# Altium PCB ARU8113 Testboard_V0.1.PcbDoc (part 2 of 3)
Units mil, origin at the board's own origin, x right, y up, seen from the top; angles counter-clockwise.
Board outline 6377.95 x 5157.48 mil, 4 copper layers (Top, PWR, GND, Bottom), stack 62.992 mil thick; 518 components, 350 nets, 1764 pads, 749 vias.
Unrouted connection lines stored in the file: 230.
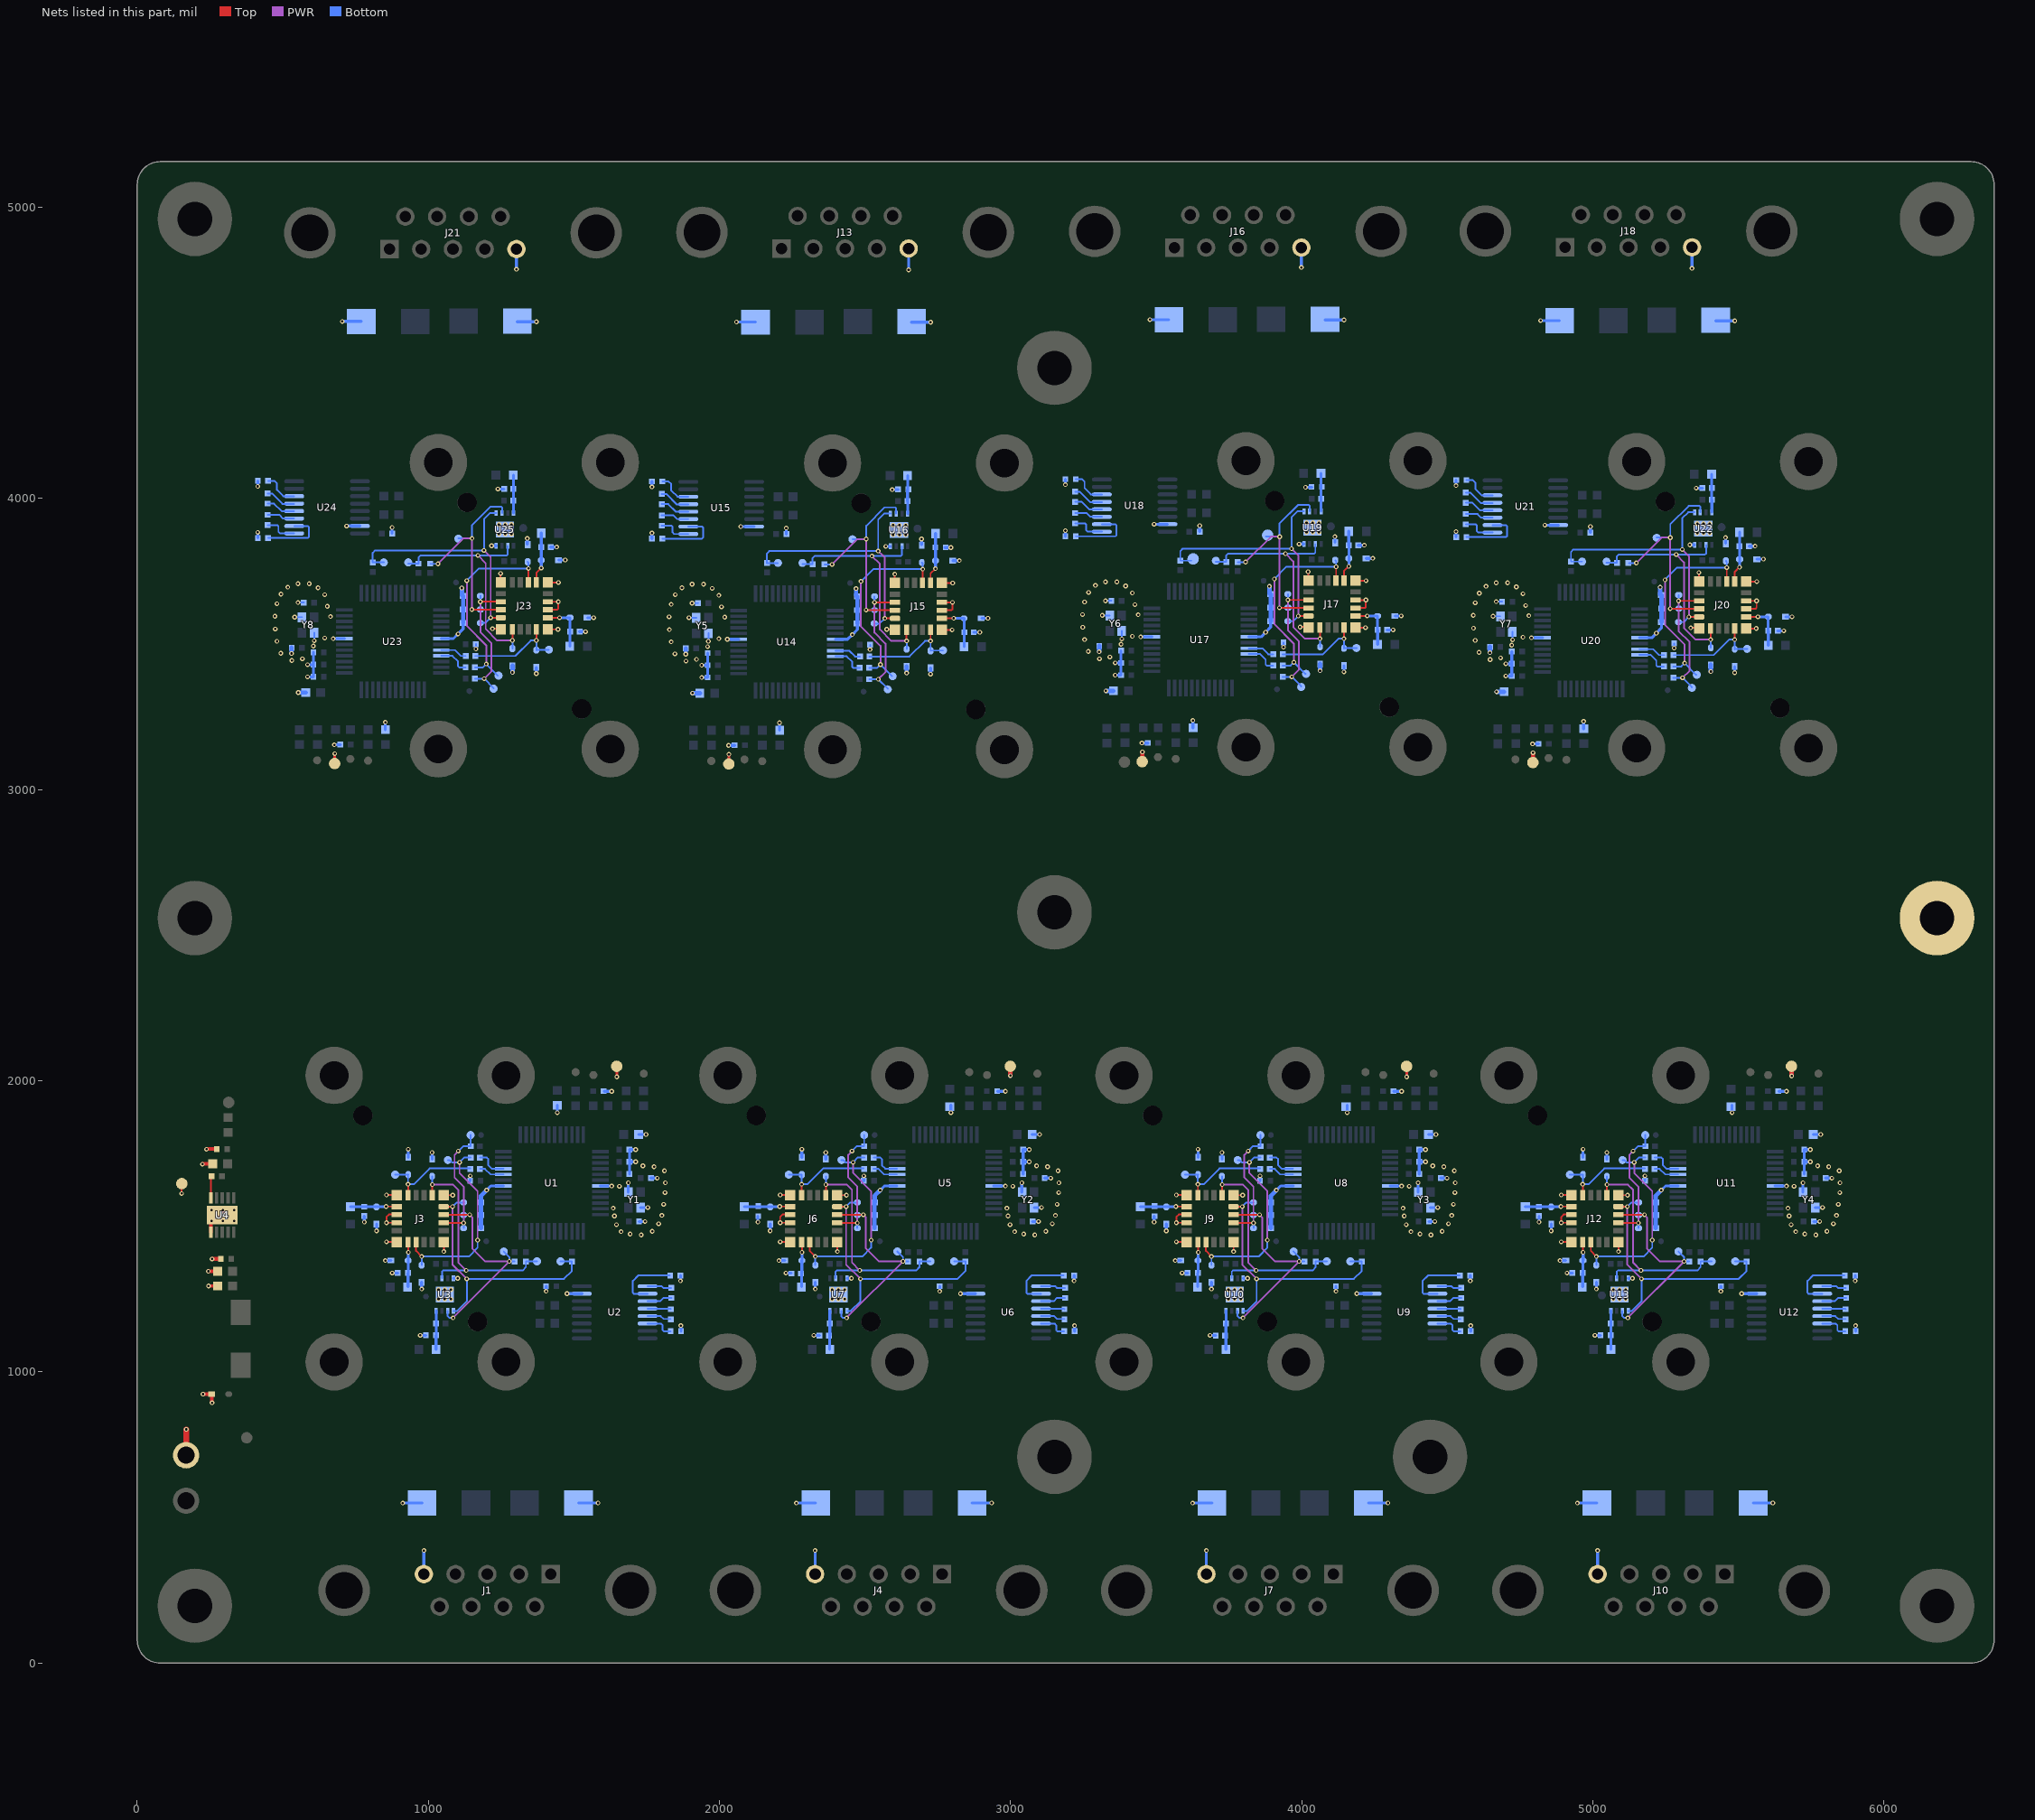
[diagram p4: the nets of this part, all layers, seen from the top]

## Via types
v1: diameter 16, hole 8, Top to Bottom, tented both sides, 749 vias

## Nets (pads, with @x,y where several pads share a name; then routed paths per layer and width w, separated by ;. In a path a pad name is that pad's centre, name@x,y a point inside that pad or via, vN(x,y) a via of type N, cw(c..) or ccw(c..) an arc to the next point about the centre after c; other vN are vias at no path point) (continued)
GND: C1.2 C2.1 C3.2 C4.2 C5.2 C6.2 C7.1 C8.1 C11.2 C12.2 C13.2 C14.1 C15.2 C16.2 C17.2 C18.2 C19.2 C20.2 C21.2 C23.2 C24.1 C25.2 C26.2 C27.2 C28.2 C29.1 C30.1 C33.2 C34.2 C35.2 C36.1 C37.2 C38.2 C39.2 C40.1 C41.2 C42.2 C43.2 C44.2 C45.1 C46.1 C49.2 C50.2 C51.2 C52.1 C53.2 C54.2 C55.2 C56.1 C57.2 C58.2 C59.2 C60.2 C61.1 C62.1 C65.2 C66.2 C67.2 C68.1 C69.2 C70.2 C71.2 C72.1 C73.2 C74.2 C75.2 C76.2 C77.1 C78.1 C81.2 C82.2 C83.2 C84.1 C85.2 C86.2 C87.2 C88.1 C89.2 C90.2 C91.2 C92.2 C93.1 C94.1 C97.2 C98.2 C99.2 C100.1 C101.2 C102.2 C103.2 C104.1 C105.2 C106.2 C107.2 C108.2 C109.1 C110.1 C113.2 C114.2 C115.2 C116.1 C117.2 C118.2 C119.2 C120.1 C121.2 C122.2 C123.2 C124.2 C125.1 C126.1 C129.2 C130.2 C131.2 C132.1 C133.2 C134.2 D1.1 D2.1 D3.1 D4.1 D5.1 D6.1 D8.1 D9.1 D11.1 D12.1 D14.1 D15.1 D16.1 D17.1 D18.1 D19.1 D20.1 D22.1 D23.1 D25.1 D26.1 D27.1 D28.1 D29.1 D30.1 D31.1 D32.1 D34.1 D35.1 D37.1 D38.1 D39.1 D40.1 D41.1 D42.1 D43.1 D45.1 D46.1 D48.1 D49.1 D50.1 D51.1 D52.1 D53.1 D54.1 D55.1 D57.1 D58.1 D60.1 D61.1 D62.1 D63.1 D64.1 D65.1 D66.1 D67.1 D69.1 D70.1 D72.1 D73.1 D74.1 D75.1 D76.1 D77.1 D78.1 D79.1 D81.1 D82.1 D84.1 D85.1 D86.1 D87.1 D88.1 D89.1 D90.1 D91.1 D93.1 D94.1 D96.1 D97.1 D98.1 DC1.2 J1.5 J3.10 J3.11 J3.17 J3.18 J3.19 J3.20 J4.5 J6.10 J6.11 J6.17 J6.18 J6.19 J6.20 J7.5 J9.10 J9.11 J9.17 J9.18 J9.19 J9.20 J10.5 J12.10 J12.11 J12.17 J12.18 J12.19 J12.20 J13.5 J15.10 J15.11 J15.17 J15.18 J15.19 J15.20 J16.5 J17.10 J17.11 J17.17 J17.18 J17.19 J17.20 J18.5 J20.10 J20.11 J20.17 J20.18 J20.19 J20.20 J21.5 J23.10 J23.11 J23.17 J23.18 J23.19 J23.20 pad.2@6182.25,2558.2 R7.1 R26.1 R43.1 R60.1 R77.1 R94.1 R111.1 R128.1 T15.1 T16.1 T17.1 T28.1 T40.1 T52.1 T64.1 T76.1 T88.1 U1.7 U1.30 U2.15 U3.4 U3.9 U4.6 U4.11 U5.7 U5.30 U6.15 U7.4 U7.9 U8.7 U8.30 U9.15 U10.4 U10.9 U11.7 U11.30 U12.15 U13.4 U13.9 U14.7 U14.30 U15.15 U16.4 U16.9 U17.7 U17.30 U18.15 U19.4 U19.9 U20.7 U20.30 U21.15 U22.4 U22.9 U23.7 U23.30 U24.15 U25.4 U25.9 Y1.2 Y1.4 Y2.2 Y2.4 Y3.2 Y3.4 Y4.2 Y4.4 Y5.2 Y5.4 Y6.2 Y6.4 Y7.2 Y7.4 Y8.2 Y8.4 | length 10981
  Top w6: v1(152.56,1612) 152.56,1645.54 T16.1@153.13,1646.1 ; v1(856.32,1446) J3.19@890,1446 ; v1(856.32,1607) J3.20@891,1607 ; J3.10@890.89,1511.82 856.43,1511.82 856.43,1531.43 864.74,1539.74 J3.11@891,1539.74 ; J3.17@1052.42,1606.42 v1(1084,1606.42) ; v1(1053,1413) J3.18@1053,1445 ; v1(1220.37,3552.01) J23.17@1247.41,3552.01 ; J23.18@1248,3713 1248.04,3713.04 v1(1248.04,3741.96) ; J23.20@1410.42,3550 v1(1445,3550) ; J23.11@1410.42,3617.34 1442.81,3617.34 1446.32,3620.86 v1(1446.32,3644.71) ; J23.10@1410.42,3644.8 v1@1446.22,3644.8 ; J23.19@1410.42,3711 v1(1447,3711) ; v1(2208.32,1446) J6.19@2242,1446 ; v1(2208.32,1607) J6.20@2243,1607 ; J6.10@2242.89,1511.82 2208.43,1511.82 2208.43,1531.43 2216.74,1539.74 J6.11@2243,1539.74 ; J6.17@2404.42,1606.42 v1(2436,1606.42) ; v1(2405,1413) J6.18@2405,1445 ; v1(2574.37,3550.01) J15.17@2601.41,3550.01 ; J15.18@2602,3711 2602.04,3711.04 v1(2602.04,3739.96) ; J15.20@2764.42,3548 v1(2799,3548) ; J15.11@2764.42,3615.34 2796.81,3615.34 2800.32,3618.86 v1(2800.32,3642.71) ; J15.10@2764.42,3642.8 v1@2800.22,3642.8 ; J15.19@2764.42,3709 v1(2801,3709) ; v1(3569.32,1446) J9.19@3603,1446 ; v1(3569.32,1607) J9.20@3604,1607 ; J9.10@3603.89,1511.82 3569.43,1511.82 3569.43,1531.43 3577.74,1539.74 J9.11@3604,1539.74 ; J9.17@3765.42,1606.42 v1(3797,1606.42) ; v1(3766,1413) J9.18@3766,1445 ; v1(3994.37,3558.01) J17.17@4021.41,3558.01 ; J17.18@4022,3719 4022.04,3719.04 v1(4022.04,3747.96) ; J17.20@4184.42,3556 v1(4219,3556) ; J17.11@4184.42,3623.34 4216.81,3623.34 4220.32,3626.86 v1(4220.32,3650.71) ; J17.10@4184.42,3650.8 v1@4220.22,3650.8 ; J17.19@4184.42,3717 v1(4221,3717) ; v1(4891.32,1446) J12.19@4925,1446 ; v1(4891.32,1607) J12.20@4926,1607 ; J12.10@4925.89,1511.82 4891.43,1511.82 4891.43,1531.43 4899.74,1539.74 J12.11@4926,1539.74 ; J12.17@5087.42,1606.42 v1(5119,1606.42) ; v1(5088,1413) J12.18@5088,1445 ; v1(5336.37,3555.01) J20.17@5363.41,3555.01 ; J20.18@5364,3716 5364.04,3716.04 v1(5364.04,3744.96) ; J20.20@5526.42,3553 v1(5561,3553) ; J20.11@5526.42,3620.34 5558.81,3620.34 5562.32,3623.86 v1(5562.32,3647.71) ; J20.10@5526.42,3647.8 v1@5562.22,3647.8 ; J20.19@5526.42,3714 v1(5563,3714)
  Top w10: v1(257.13,1387.1) v1@257.63,1387.6 ; C17.2@286.91,1387.6 C17.2@287.41,1388.11 ; T17.1@678.5,3089 v1(678.5,3123) ; v1@1647.5,2013.5 T15.1@1647.5,2048.5 ; T64.1@2032.5,3087 v1(2032.5,3121) ; v1@4360.5,2013.5 T40.1@4360.5,2048.5
  Top w11.81: v1@224.13,1714.11 C20.2@259.54,1714.11 ; v1(226.13,923.1) D14.1@255.6,923.1 256.36,922.34 256.36,893.87 v1(257.13,893.1) ; v1(238,1764.1) 239,1765.11 C21.2@273.41,1765.11 C21.2@274.41,1766.11 ; v1(244,1345) 244.05,1345.05 C18.2@276.54,1345.11 ; v1(245,1294.55) C19.2@276.54,1294.55 ; U4.6@252.76,1479.05 252.76,1515.73 v1(255.13,1518.1)
  Top w15: v1@257.63,1387.6 C17.2@286.91,1387.6 ; v1(2999,2017) T28.1@2999,2049 ; T76.1@3452,3095.5 3452.31,3095.81 3452.31,3128.81 v1(3452.5,3129) ; T88.1@4794,3092.5 4794.31,3092.81 4794.31,3125.81 v1(4794.5,3126) ; v1(5683,2016) T52.1@5683,2048
  Top w20: DC1.2@168.56,713.49 v1(168.56,802)
  Bottom w6: v1(541,3592) Y8.4@566.33,3592 ; v1(552,3642) C126.1@572.28,3642 ; v1(608,3511) Y8.2@608,3538.43 ; v1(1163.3,3482.69) C123.2@1163.3,3499 ; v1(1895,3590) Y5.4@1920.33,3590 ; v1(1906,3640) C78.1@1926.28,3640 ; v1(1962,3509) Y5.2@1962,3536.43 ; v1(2517.3,3480.69) C75.2@2517.3,3497 ; v1(3315,3598) Y6.4@3340.33,3598 ; v1(3326,3648) C94.1@3346.28,3648 ; v1(3382,3517) Y6.2@3382,3544.43 ; v1(3937.3,3488.69) C91.2@3937.3,3505 ; v1(4657,3595) Y7.4@4682.33,3595 ; v1(4668,3645) C110.1@4688.28,3645 ; v1(4724,3514) Y7.2@4724,3541.43 ; v1(5279.3,3485.69) C107.2@5279.3,3502
  Bottom w10: C131.2@414,3863.95 v1(414,3883) ; v1@414.14,4041.14 C130.2@414.14,4060 ; v1(585,3386.71) C120.1@603.28,3386.71 ; v1(585,3428.71) C121.2@605.29,3428.71 ; C120.1@605.28,3386.71 C121.2@605.29,3428.71 ; C122.2@605.29,3470.71 C121.2@605.29,3428.71 ; v1@673.09,3518.09 U23.7@711.54,3518.09 ; v1@677.5,3153.5 C124.2@697.48,3153.5 ; v1(704.32,4607.71) D93.1@769.18,4607.71 ; v1(719,3905) U24.15@764.95,3905 ; v1(780,1514) C16.2@779.98,1534.49 ; v1(822,1484) D12.1@822,1507.47 ; R128.1@852,3205.59 v1(852,3231) ; v1(852.23,1381.98) D11.1@871.7,1381.96 ; C129.2@875.54,3879.54 v1@875.54,3900 ; v1(876,1339) C15.2@894.57,1339 ; v1(912,549) D9.1@978.5,549 ; D1.1@931,1736.06 v1(931,1764) ; v1(972,1125) C14.1@991.28,1125 ; v1(977,1284) D2.1@977,1307 ; J1.5@984.72,305.2 v1@984.72,386 ; D5.1@1013,1730.53 v1(1013,1753) ; U23.30@1044.21,3518.17 1086.17,3518.17 v1(1102,3534) 1119.39,3551.39 D89.1@1119.39,3571.61 ; U3.4@1086.5,1321 v1(1101,1321) ; C5.2@1143.72,1655.65 v1(1143.72,1672.61) ; v1@1200.38,1624 1214.64,1638.26 U1.30@1257.79,1638.26 ; v1(1217,3837) U25.4@1233.3,3837 ; v1(1239,4032) C132.1@1260,4032 ; v1(1302.69,4787) J21.5@1302.69,4856.19 ; D94.1@1305.93,4606.71 v1(1371.32,4606.71) ; D87.1@1339.81,3843.19 v1(1339.81,3862.47) ; v1(1371,3398) D86.1@1371,3418.7 ; v1(1404.64,1276.29) C11.2@1404.64,1294 ; C133.2@1420.28,3832.75 v1@1440.75,3832.75 ; v1(1443,1889.82) R7.1@1443,1915.41 ; D96.1@1447.41,3787.91 v1@1469.64,3787.91 ; v1(1476.02,1268) U2.15@1527.2,1268 ; D8.1@1515.65,549.1 v1(1583,549.1) ; C134.2@1519.14,3542 v1(1540,3542) ; D97.1@1547.36,3590.02 v1(1568,3590) ; U1.7@1590.46,1638.13 v1@1629.61,1638.13 ; C6.2@1603.86,1963.08 v1(1630,1963.08) ; Y1.2@1686.67,1617.07 v1@1686.67,1648.33 ; C4.2@1690.71,1679 C3.2@1690.71,1721 ; v1(1712,1721) C3.2@1690.71,1721 ; v1(1712,1763) C2.1@1690.72,1763 C3.2@1690.71,1721 ; C1.2@1722.18,1815 v1(1747.77,1815) ; C8.1@1723.72,1516 v1(1744,1516) ; Y1.4@1728.75,1564 v1(1754,1564) ; C7.1@1764.72,1665 v1(1786,1665) ; C83.2@1768,3861.95 v1(1768,3881) ; v1@1768.14,4039.14 C82.2@1768.14,4058 ; v1(1866,1312) C13.2@1866,1330 ; C12.2@1867.54,1139.47 v1@1867.54,1158.39 ; v1(1939,3384.71) C72.1@1957.28,3384.71 ; v1(1939,3426.71) C73.2@1959.29,3426.71 ; C72.1@1959.28,3384.71 C73.2@1959.29,3426.71 ; C74.2@1959.29,3468.71 C73.2@1959.29,3426.71 ; v1@2027.09,3516.09 U14.7@2065.54,3516.09 ; v1@2031.5,3151.5 C76.2@2051.48,3151.5 ; v1(2058.32,4605.71) D57.1@2123.18,4605.71 ; v1(2073,3903) U15.15@2118.95,3903 ; v1(2132,1514) C38.2@2131.98,1534.49 ; v1(2174,1484) D26.1@2174,1507.47 ; v1(2204.23,1381.98) D25.1@2223.7,1381.96 ; R77.1@2206,3203.59 v1(2206,3229) ; v1(2228,1339) C37.2@2246.57,1339 ; C81.2@2229.54,3877.54 v1@2229.54,3898 ; v1(2264,549) D23.1@2330.5,549 ; D15.1@2283,1736.06 v1(2283,1764) ; v1(2324,1125) C36.1@2343.28,1125 ; J4.5@2328.43,304.91 v1(2328.43,386) ; v1(2329,1284) D16.1@2329,1307 ; D19.1@2365,1730.53 v1(2365,1753) ; U14.30@2398.21,3516.17 2440.17,3516.17 v1(2456,3532) 2473.39,3549.39 D53.1@2473.39,3569.61 ; U7.4@2438.5,1321 v1(2453,1321) ; C27.2@2495.72,1655.65 v1(2495.72,1672.61) ; v1@2552.38,1624 2566.64,1638.26 U5.30@2609.79,1638.26 ; v1(2571,3835) U16.4@2587.3,3835 ; v1(2593,4030) C84.1@2614,4030 ; v1(2649.69,4785) J13.5@2649.69,4858.19 ; D58.1@2659.93,4604.71 v1(2725.32,4604.71) ; D51.1@2693.81,3841.19 v1(2693.81,3860.47) ; v1(2725,3396) D50.1@2725,3416.7 ; v1(2756.64,1276.29) C33.2@2756.64,1294 ; C85.2@2774.28,3830.75 v1@2794.75,3830.75 ; v1(2795,1889.82) R26.1@2795,1915.4 ; D60.1@2801.41,3785.91 v1@2823.64,3785.91 ; v1(2828.02,1268) U6.15@2879.2,1268 ; D22.1@2867.65,549.1 v1(2935,549.1) ; C86.2@2873.14,3540 v1(2894,3540) ; D61.1@2901.36,3588.02 v1(2922,3588) ; U5.7@2942.46,1638.13 v1@2981.61,1638.13 ; C28.2@2955.86,1963.08 v1(2982,1963.08) ; Y2.2@3038.67,1617.07 v1@3038.67,1648.33 ; C26.2@3042.71,1679 C25.2@3042.71,1721 ; v1(3064,1721) C25.2@3042.71,1721 ; v1(3064,1763) C24.1@3042.72,1763 C25.2@3042.71,1721 ; C23.2@3074.18,1815 v1(3099.77,1815) ; C30.1@3075.72,1516 v1(3096,1516) ; Y2.4@3080.75,1564 v1(3106,1564) ; C29.1@3116.72,1665 v1(3138,1665) ; C99.2@3188,3869.95 v1(3188,3889) ; v1@3188.14,4047.14 C98.2@3188.14,4066 ; v1(3218,1312) C35.2@3218,1330 ; C34.2@3219.54,1139.47 v1@3219.54,1158.39 ; v1(3359,3392.71) C88.1@3377.28,3392.71 ; v1(3359,3434.71) C89.2@3379.29,3434.71 ; C88.1@3379.28,3392.71 C89.2@3379.29,3434.71 ; C90.2@3379.29,3476.71 C89.2@3379.29,3434.71 ; v1@3447.09,3524.09 U17.7@3485.54,3524.09 ; v1@3451.5,3159.5 C92.2@3471.48,3159.5 ; v1(3478.32,4613.71) D69.1@3543.18,4613.71 ; v1(3493,1514) C54.2@3492.98,1534.49 ; v1(3493,3911) U18.15@3538.95,3911 ; v1(3535,1484) D98.1@3535,1507.47 ; v1(3565.23,1381.98) D37.1@3584.7,1381.96 ; v1(3589,1339) C53.2@3607.57,1339 ; v1(3625,549) D35.1@3691.5,549 ; R94.1@3626,3211.59 v1(3626,3237) ; D27.1@3644,1736.06 v1(3644,1764) ; C97.2@3649.54,3885.54 v1@3649.54,3906 ; J7.5@3672.43,304.91 v1(3672.43,386) ; v1(3685,1125) C52.1@3704.28,1125 ; v1(3690,1284) D28.1@3690,1307 ; D31.1@3726,1730.53 v1(3726,1753) ; U10.4@3799.5,1321 v1(3814,1321) ; U17.30@3818.21,3524.17 3860.17,3524.17 v1(3876,3540) 3893.39,3557.39 D65.1@3893.39,3577.61 ; C43.2@3856.72,1655.65 v1(3856.72,1672.61) ; v1@3913.38,1624 3927.64,1638.26 U8.30@3970.79,1638.26 ; v1(3991,3843) U19.4@4007.3,3843 ; v1(3998.82,4793) J16.5@3998.82,4861.29 ; v1(4013,4038) C100.1@4034,4038 ; D70.1@4079.93,4612.71 v1(4145.32,4612.71) ; D63.1@4113.81,3849.19 v1(4113.81,3868.47) ; v1(4117.64,1276.29) C49.2@4117.64,1294 ; v1(4145,3404) D62.1@4145,3424.7 ; v1(4156,1889.82) R43.1@4156,1915.4 ; v1(4189.02,1268) U9.15@4240.2,1268 ; C101.2@4194.28,3838.75 v1@4214.75,3838.75 ; D72.1@4221.41,3793.91 v1@4243.64,3793.91 ; D34.1@4228.65,549.1 v1(4296,549.1) ; C102.2@4293.14,3548 v1(4314,3548) ; U8.7@4303.46,1638.13 v1@4342.61,1638.13 ; C44.2@4316.86,1963.08 v1(4343,1963.08) ; D73.1@4321.36,3596.02 v1(4342,3596) ; Y3.2@4399.67,1617.07 v1@4399.67,1648.33 ; C42.2@4403.71,1679 C41.2@4403.71,1721 ; v1(4425,1721) C41.2@4403.71,1721 ; v1(4425,1763) C40.1@4403.72,1763 C41.2@4403.71,1721 ; C39.2@4435.18,1815 v1(4460.77,1815) ; C46.1@4436.72,1516 v1(4457,1516) ; Y3.4@4441.75,1564 v1(4467,1564) ; C45.1@4477.72,1665 v1(4499,1665) ; C115.2@4530,3866.95 v1(4530,3886) ; v1@4530.14,4044.14 C114.2@4530.14,4063 ; v1(4579,1312) C51.2@4579,1330 ; C50.2@4580.54,1139.47 v1@4580.54,1158.39 ; v1(4701,3389.71) C104.1@4719.28,3389.71 ; v1(4701,3431.71) C105.2@4721.29,3431.71 ; C104.1@4721.28,3389.71 C105.2@4721.29,3431.71 ; C106.2@4721.29,3473.71 C105.2@4721.29,3431.71 ; v1@4789.09,3521.09 U20.7@4827.54,3521.09 ; v1@4793.5,3156.5 C108.2@4813.48,3156.5 ; v1(4815,1514) C70.2@4814.98,1534.49 ; v1(4820.32,4610.71) D81.1@4885.18,4610.71 ; v1(4835,3908) U21.15@4880.95,3908 ; v1(4857,1484) D49.1@4857,1507.47 ; v1(4887.23,1381.98) D48.1@4906.7,1381.96 ; v1(4911,1339) C69.2@4929.57,1339 ; v1(4947,549) D46.1@5013.5,549 ; D38.1@4966,1736.06 v1(4966,1764) ; R111.1@4968,3208.59 v1(4968,3234) ; C113.2@4991.54,3882.54 v1@4991.54,3903 ; v1(5007,1125) C68.1@5026.28,1125 ; v1(5012,1284) D39.1@5012,1307 ; J10.5@5016.43,304.91 v1(5016.43,386) ; D42.1@5048,1730.53 v1(5048,1753) ; U13.4@5121.5,1321 v1(5136,1321) ; U20.30@5160.21,3521.17 5202.17,3521.17 v1(5218,3537) 5235.39,3554.39 D77.1@5235.39,3574.61 ; C59.2@5178.72,1655.65 v1(5178.72,1672.61) ; v1@5235.38,1624 5249.64,1638.26 U11.30@5292.79,1638.26 ; v1(5333,3840) U22.4@5349.3,3840 ; v1(5340.69,4790) J18.5@5340.69,4862.19 ; v1(5355,4035) C116.1@5376,4035 ; D82.1@5421.93,4609.71 v1(5487.32,4609.71) ; v1(5439.64,1276.29) C65.2@5439.64,1294 ; D75.1@5455.81,3846.19 v1(5455.81,3865.47) ; v1(5478,1889.82) R60.1@5478,1915.4 ; v1(5487,3401) D74.1@5487,3421.7 ; v1(5511.02,1268) U12.15@5562.2,1268 ; C117.2@5536.28,3835.75 v1@5556.75,3835.75 ; D45.1@5550.65,549.1 v1(5618,549.1) ; D84.1@5563.41,3790.91 v1@5585.64,3790.91 ; U11.7@5625.46,1638.13 v1@5664.61,1638.13 ; C118.2@5635.14,3545 v1(5656,3545) ; C60.2@5638.86,1963.08 v1(5665,1963.08) ; D85.1@5663.36,3593.02 v1(5684,3593) ; Y4.2@5721.67,1617.07 v1@5721.67,1648.33 ; C58.2@5725.71,1679 C57.2@5725.71,1721 ; v1(5747,1721) C57.2@5725.71,1721 ; v1(5747,1763) C56.1@5725.72,1763 C57.2@5725.71,1721 ; C55.2@5757.18,1815 v1(5782.77,1815) ; C62.1@5758.72,1516 v1(5779,1516) ; Y4.4@5763.75,1564 v1(5789,1564) ; C61.1@5799.72,1665 v1(5821,1665) ; v1(5901,1312) C67.2@5901,1330 ; C66.2@5902.54,1139.47 v1@5902.54,1158.39
  Bottom w15: v1(530.19,3467) C125.1@530.19,3487 ; v1(553.23,3332.71) C119.2@578.82,3332.71 ; v1(1115,3692) 1115.19,3691.81 1115.19,3667.34 1117.53,3665 D91.1@1119.47,3665 D89.1@1119.47,3572.47 ; D6.1@1180.53,1493 D3.1@1180.53,1538 D4.1@1180.53,1581 ; D4.1@1181,1581.47 1181,1604.73 v1@1200,1623.73 ; v1(1289,3402) D90.1@1289,3424.94 ; v1(1884.19,3465) C77.1@1884.19,3485 ; v1(1907.23,3330.71) C71.2@1932.82,3330.71 ; v1(2469,3690) 2469.19,3689.81 2469.19,3665.34 2471.53,3663 D55.1@2473.47,3663 D53.1@2473.47,3570.47 ; D20.1@2532.53,1493 D17.1@2532.53,1538 D18.1@2532.53,1581 ; D18.1@2533,1581.47 2533,1604.73 v1@2552,1623.73 ; v1(2643,3400) D54.1@2643,3422.94 ; v1(3304.19,3473) C93.1@3304.19,3493 ; v1(3327.23,3338.71) C87.2@3352.82,3338.71 ; v1(3889,3698) 3889.19,3697.81 3889.19,3673.34 3891.53,3671 D67.1@3893.47,3671 D65.1@3893.47,3578.47 ; D32.1@3893.53,1493 D29.1@3893.53,1538 D30.1@3893.53,1581 ; D30.1@3894,1581.47 3894,1604.73 v1@3913,1623.73 ; v1(4063,3408) D66.1@4063,3430.94 ; v1(4646.19,3470) C109.1@4646.19,3490 ; v1(4669.23,3335.71) C103.2@4694.82,3335.71 ; D43.1@5215.53,1493 D40.1@5215.53,1538 D41.1@5215.53,1581 ; D41.1@5216,1581.47 5216,1604.73 v1@5235,1623.73 ; v1(5231,3695) 5231.19,3694.81 5231.19,3670.34 5233.53,3668 D79.1@5235.47,3668 D77.1@5235.47,3575.47 ; v1(5405,3405) D78.1@5405,3427.94
  other v1: 985,386 1867.36,1158.56 3219.36,1158.56 4580.36,1158.56 5902.36,1158.56 1035,1249 1056.5,1249 1078,1249 2387,1249 2408.5,1249 2430,1249 3748,1249 3769.5,1249 3791,1249 5070,1249 5091.5,1249 5113,1249 1035,1282 1056.5,1282 1078,1282 2387,1282 2408.5,1282 2430,1282 3748,1282 3769.5,1282 3791,1282 5070,1282 5091.5,1282 5113,1282 1731,1470 3083,1470 4444,1470 5766,1470 1693,1473 3045,1473 4406,1473 5728,1473 1662,1481 3014,1481 4375,1481 5697,1481 1769,1482 3121,1482 4482,1482 5804,1482 1646,1505 2998,1505 4359,1505 5681,1505 1791,1508 3143,1508 4504,1508 5826,1508 856.32,1511.71 2208.32,1511.71 3569.32,1511.71 4891.32,1511.71 294.13,1518.1 333.13,1518.1 1639,1535 2991,1535 4352,1535 5674,1535 1802,1537 3154,1537 4515,1537 5837,1537 255.13,1555.1 294.13,1555.1 333.13,1555.1 1635,1562 2987,1562 4348,1562 5670,1562 1808,1575 3160,1575 4521,1575 5843,1575 1813,1615 3165,1615 4526,1615 5848,1615 1200,1624 2552,1624 3913,1624 5235,1624 1656,1637 3008,1637 4369,1637 5691,1637 1630,1638 2982,1638 4343,1638 5665,1638 1686.66,1649 1814,1649 3038.66,1649 3166,1649 4399.66,1649 4527,1649 5721.67,1649 5849,1649 1811,1690 3163,1690 4524,1690 5846,1690 1775,1704 3127,1704 4488,1704 5810,1704 1737,1707 3089,1707 4450,1707 5772,1707 224.13,1713.1 1647.5,2013 4360.5,2013 2031,3151.5 677,3153.5 4793,3156.5 3451,3159.5 1885,3441 531,3443 4647,3446 1921,3447 567,3449 3305,3449 4683,3452 3341,3455 1847,3466 493,3468 4609,3471 3267,3474 1959,3490.71 605,3492.71 4721,3495.71 3379,3498.71 1834,3507 480,3509 4596,3512 3254,3515 2027,3516 673,3518 1998,3518 644,3520 4789,3521 4760,3523 3447,3524 3418,3526 1828,3549 474,3551 4590,3554 3248,3557 2018,3592 1827,3593 664,3594 473,3595 4780,3597 4589,3598 3438,3600 3247,3601 2007,3627 653,3629 4769,3632 3427,3635 1834,3636 480,3638 4596,3641 3254,3644 1998,3667 644,3669 1848,3669 494,3671 4760,3672 4610,3674 3418,3675 3268,3677 1975,3691 621,3693 1871,3693 517,3695 4737,3696 4633,3698 3395,3699 3291,3701 1906,3705 1945,3705 552,3707 591,3707 4668,3710 4707,3710 3326,3713 3365,3713 2824,3786.27 1470,3788.27 5586,3791.27 4244,3794.27 2795,3831 1441,3833 5557,3836 4215,3839 2596.5,3875 2618,3875 2639.5,3875 1242.5,3877 1264,3877 1285.5,3877 5358.5,3880 5380,3880 5401.5,3880 4016.5,3883 4038,3883 4059.5,3883 2229.36,3898 875.36,3900 4991.36,3903 3649.36,3906 2596.5,3908 2618,3908 2639.5,3908 1242.5,3910 1264,3910 1285.5,3910 5358.5,3913 5380,3913 5401.5,3913 4016.5,3916 4038,3916 4059.5,3916 1768,4039 414,4041 4530,4044 3188,4047
IMU_CS_1: D6.2 J3.3 R12.2 T10.1 | length 438.7
  Top w6: J3.3@1052.42,1511.46 v1@1121.11,1511.46
  PWR w6: v1(1103,1758) 1090,1745 1090,1667 1121.11,1635.89 v1(1121.11,1511)
  Bottom w6: v1@1103.33,1758 1120.33,1775 R12.2@1144.95,1775 ; D6.2@1121.29,1493 v1@1121.29,1511 ; R12.2@1145,1774.95 T10.1@1145,1813
IMU_CS_2: D20.2 J6.3 R30.2 T27.1 | length 438.7
  Top w6: J6.3@2404.42,1511.46 v1@2473.11,1511.46
  PWR w6: v1(2455,1758) 2442,1745 2442,1667 2473.11,1635.89 v1(2473.11,1511)
  Bottom w6: v1@2455.33,1758 2472.33,1775 R30.2@2496.95,1775 ; D20.2@2473.29,1493 v1@2473.29,1511 ; R30.2@2497,1774.95 T27.1@2497,1813
IMU_CS_3: D32.2 J9.3 R47.2 T39.1 | length 438.7
  Top w6: J9.3@3765.42,1511.46 v1@3834.11,1511.46
  PWR w6: v1(3816,1758) 3803,1745 3803,1667 3834.11,1635.89 v1(3834.11,1511)
  Bottom w6: v1@3816.33,1758 3833.33,1775 R47.2@3857.95,1775 ; D32.2@3834.29,1493 v1@3834.29,1511 ; R47.2@3858,1774.95 T39.1@3858,1813
IMU_CS_4: D43.2 J12.3 R64.2 T51.1 | length 438.7
  Top w6: J12.3@5087.42,1511.46 v1@5156.11,1511.46
  PWR w6: v1(5138,1758) 5125,1745 5125,1667 5156.11,1635.89 v1(5156.11,1511)
  Bottom w6: v1@5138.33,1758 5155.33,1775 R64.2@5179.95,1775 ; D43.2@5156.29,1493 v1@5156.29,1511 ; R64.2@5180,1774.95 T51.1@5180,1813
IMU_CS_5: D55.2 J15.3 R81.2 T63.1 | length 457.1
  Top w6: v1@2533,3642.9 J15.3@2603,3642.9
  PWR w6: v1(2532.53,3642.9) 2532.53,3538.47 2570,3501 2570,3403 v1(2545.65,3378.65)
  Bottom w6: R81.2@2514.28,3378.65 v1(2545.65,3378.65) T63.1@2578,3346.31 ; v1(2532.53,3642.9) D55.2@2532.53,3663
IMU_CS_6: D67.2 J17.3 R98.2 T75.1 | length 457.1
  Top w6: v1@3953,3650.9 J17.3@4023,3650.9
  PWR w6: v1(3952.53,3650.9) 3952.53,3546.47 3990,3509 3990,3411 v1(3965.65,3386.65)
  Bottom w6: R98.2@3934.28,3386.65 v1(3965.65,3386.65) T75.1@3998,3354.31 ; v1(3952.53,3650.9) D67.2@3952.53,3671
IMU_CS_7: D79.2 J20.3 R115.2 T87.1 | length 457.1
  Top w6: v1@5295,3647.9 J20.3@5365,3647.9
  PWR w6: v1(5294.53,3647.9) 5294.53,3543.47 5332,3506 5332,3408 v1(5307.65,3383.65)
  Bottom w6: R115.2@5276.28,3383.65 v1(5307.65,3383.65) T87.1@5340,3351.31 ; v1(5294.53,3647.9) D79.2@5294.53,3668
IMU_CS_8: D91.2 J23.3 R132.2 T99.1 | length 457.1
  Top w6: v1@1179,3644.9 J23.3@1249,3644.9
  PWR w6: v1(1178.53,3644.9) 1178.53,3540.47 1216,3503 1216,3405 v1(1191.65,3380.65)
  Bottom w6: R132.2@1160.28,3380.65 v1(1191.65,3380.65) T99.1@1224,3348.31 ; v1(1178.53,3644.9) D91.2@1178.53,3665
IMU_INT1_1: D1.2 J3.13 R3.2 T2.1 | length 350
  Top w6: J3.13@930.37,1606.42 v1@930.37,1643.81
  Bottom w6: T2.1@886,1677 D1.2@931,1677 ; D1.2@930.18,1676.18 v1(930.18,1644) 950,1644 1004.28,1698.28 R3.2@1143.13,1698.28
IMU_INT1_2: D15.2 J6.13 R21.2 T19.1 | length 350
  Top w6: J6.13@2282.37,1606.42 v1@2282.37,1643.81
  Bottom w6: T19.1@2238,1677 D15.2@2283,1677 ; D15.2@2282.18,1676.18 v1(2282.18,1644) 2302,1644 2356.28,1698.28 R21.2@2495.13,1698.28
IMU_INT1_3: D27.2 J9.13 R38.2 T31.1 | length 350
  Top w6: J9.13@3643.37,1606.42 v1@3643.37,1643.81
  Bottom w6: T31.1@3599,1677 D27.2@3644,1677 ; D27.2@3643.18,1676.18 v1(3643.18,1644) 3663,1644 3717.28,1698.28 R38.2@3856.13,1698.28
IMU_INT1_4: D38.2 J12.13 R55.2 T43.1 | length 350
  Top w6: J12.13@4965.37,1606.42 v1@4965.37,1643.81
  Bottom w6: T43.1@4921,1677 D38.2@4966,1677 ; D38.2@4965.18,1676.18 v1(4965.18,1644) 4985,1644 5039.28,1698.28 R55.2@5178.13,1698.28
IMU_INT1_5: D50.2 J15.13 R72.2 T55.1 | length 346.5
  Top w6: v1(2725,3510) J15.13@2725.05,3548.41
  Bottom w6: R72.2@2514.81,3456.65 2652.65,3456.65 2706,3510 v1(2725,3510) D50.2@2725,3476.4 ; D50.2@2725.8,3477.2 T55.1@2768,3477.2
IMU_INT1_6: D62.2 J17.13 R89.2 T67.1 | length 346.5
  Top w6: v1(4145,3518) J17.13@4145.05,3556.41
  Bottom w6: R89.2@3934.81,3464.65 4072.65,3464.65 4126,3518 v1(4145,3518) D62.2@4145,3484.4 ; D62.2@4145.8,3485.2 T67.1@4188,3485.2
IMU_INT1_7: D74.2 J20.13 R106.2 T79.1 | length 346.5
  Top w6: v1(5487,3515) J20.13@5487.05,3553.41
  Bottom w6: R106.2@5276.81,3461.65 5414.65,3461.65 5468,3515 v1(5487,3515) D74.2@5487,3481.4 ; D74.2@5487.8,3482.2 T79.1@5530,3482.2
IMU_INT1_8: D86.2 J23.13 R123.2 T91.1 | length 346.5
  Top w6: v1(1371,3512) J23.13@1371.05,3550.41
  Bottom w6: R123.2@1160.81,3458.65 1298.65,3458.65 1352,3512 v1(1371,3512) D86.2@1371,3478.4 ; D86.2@1371.8,3479.2 T91.1@1414,3479.2
IMU_INT2_1: D2.2 J3.7 R6.2 T5.1 | length 697.5
  Top w6: J3.7@957.93,1445 957.93,1415.07 v1(977,1396)
  PWR w6: v1(1107,1719.09) 1107,1682.37 1169,1620.37 v1(1169,1452)
  Bottom w6: D2.2@977,1367.16 v1(977,1396) 1139,1396 1169,1426 v1(1169,1452) ; T5.1@1067,1727 1072.83,1727 1080.74,1719.09 v1(1107,1719.09) 1107.09,1719.09 1124,1736 R6.2@1145.29,1736
IMU_INT2_2: D16.2 J6.7 R24.2 T22.1 | length 697.5
  Top w6: J6.7@2309.93,1445 2309.93,1415.07 v1(2329,1396)
  PWR w6: v1(2459,1719.09) 2459,1682.37 2521,1620.37 v1(2521,1452)
  Bottom w6: D16.2@2329,1367.16 v1(2329,1396) 2491,1396 2521,1426 v1(2521,1452) ; T22.1@2419,1727 2424.83,1727 2432.74,1719.09 v1(2459,1719.09) 2459.09,1719.09 2476,1736 R24.2@2497.29,1736
IMU_INT2_3: D28.2 J9.7 R41.2 T34.1 | length 697.5
  Top w6: J9.7@3670.93,1445 3670.93,1415.07 v1(3690,1396)
  PWR w6: v1(3820,1719.09) 3820,1682.37 3882,1620.37 v1(3882,1452)
  Bottom w6: D28.2@3690,1367.16 v1(3690,1396) 3852,1396 3882,1426 v1(3882,1452) ; T34.1@3780,1727 3785.83,1727 3793.74,1719.09 v1(3820,1719.09) 3820.09,1719.09 3837,1736 R41.2@3858.29,1736
IMU_INT2_4: D39.2 J12.7 R57.2 T46.1 | length 697.5
  Top w6: J12.7@4992.93,1445 4992.93,1415.07 v1(5012,1396)
  PWR w6: v1(5142,1719.09) 5142,1682.37 5204,1620.37 v1(5204,1452)
  Bottom w6: D39.2@5012,1367.16 v1(5012,1396) 5174,1396 5204,1426 v1(5204,1452) ; T46.1@5102,1727 5107.83,1727 5115.74,1719.09 v1(5142,1719.09) 5142.09,1719.09 5159,1736 R57.2@5180.29,1736
IMU_INT2_5: D51.2 J15.7 R75.2 T58.1 | length 714
  Top w6: J15.7@2698,3709.83 v1(2698,3757)
  PWR w6: v1(2486,3715) 2486,3560 2553,3493 v1(2553,3429)
  Bottom w6: v1(2486,3715) 2528,3757 v1(2698,3757) 2698,3776.47 D51.2@2695,3779.47 ; R75.2@2514.28,3417.65 2541.65,3417.65 v1(2553,3429) T58.1@2593,3389
IMU_INT2_6: D63.2 J17.7 R91.2 T70.1 | length 714
  Top w6: J17.7@4118,3717.83 v1(4118,3765)
  PWR w6: v1(3906,3723) 3906,3568 3973,3501 v1(3973,3437)
  Bottom w6: v1(3906,3723) 3948,3765 v1(4118,3765) 4118,3784.47 D63.2@4115,3787.47 ; R91.2@3934.28,3425.65 3961.65,3425.65 v1(3973,3437) T70.1@4013,3397
IMU_INT2_7: D75.2 J20.7 R109.2 T82.1 | length 714
  Top w6: J20.7@5460,3714.83 v1(5460,3762)
  PWR w6: v1(5248,3720) 5248,3565 5315,3498 v1(5315,3434)
  Bottom w6: v1(5248,3720) 5290,3762 v1(5460,3762) 5460,3781.47 D75.2@5457,3784.47 ; R109.2@5276.28,3422.65 5303.65,3422.65 v1(5315,3434) T82.1@5355,3394
IMU_INT2_8: D87.2 J23.7 R126.2 T94.1 | length 714
  Top w6: J23.7@1344,3711.83 v1(1344,3759)
  PWR w6: v1(1132,3717) 1132,3562 1199,3495 v1(1199,3431)
  Bottom w6: v1(1132,3717) 1174,3759 v1(1344,3759) 1344,3778.47 D87.2@1341,3781.47 ; R126.2@1160.28,3419.65 1187.65,3419.65 v1(1199,3431) T94.1@1239,3391
IMU_MISO_1: D5.2 J3.16 R11.2 T9.1 U3.2 | length 824.1
  Top w6: J3.16@1013.52,1606.42 v1(1013.52,1642.71)
  PWR w6: v1(1013.52,1642.71) 1085.29,1642.71 1103,1625 1103,1375 v1(1130,1348)
  Bottom w6: v1@1013.26,1642.97 D5.2@1013.26,1671.47 ; U3.2@1046.7,1321.4 1046.7,1343.7 1051,1348 v1(1130,1348) 1323.97,1348 1335,1359.03 R11.2@1335,1378.72 ; R11.2@1335.28,1379 T9.1@1373,1379
IMU_MISO_2: D19.2 J6.16 R29.2 T26.1 U7.2 | length 824.1
  Top w6: J6.16@2365.52,1606.42 v1(2365.52,1642.71)
  PWR w6: v1(2365.52,1642.71) 2437.29,1642.71 2455,1625 2455,1375 v1(2482,1348)
  Bottom w6: v1@2365.26,1642.97 D19.2@2365.26,1671.47 ; U7.2@2398.7,1321.4 2398.7,1343.7 2403,1348 v1(2482,1348) 2675.97,1348 2687,1359.03 R29.2@2687,1378.72 ; R29.2@2687.28,1379 T26.1@2725,1379
IMU_MISO_3: D31.2 J9.16 R46.2 T38.1 U10.2 | length 824.1
  Top w6: J9.16@3726.52,1606.42 v1(3726.52,1642.71)
  PWR w6: v1(3726.52,1642.71) 3798.29,1642.71 3816,1625 3816,1375 v1(3843,1348)
  Bottom w6: v1@3726.26,1642.97 D31.2@3726.26,1671.47 ; U10.2@3759.7,1321.4 3759.7,1343.7 3764,1348 v1(3843,1348) 4036.97,1348 4048,1359.03 R46.2@4048,1378.72 ; R46.2@4048.28,1379 T38.1@4086,1379
IMU_MISO_4: D42.2 J12.16 R63.2 T50.1 U13.2 | length 824.1
  Top w6: J12.16@5048.52,1606.42 v1(5048.52,1642.71)
  PWR w6: v1(5048.52,1642.71) 5120.29,1642.71 5138,1625 5138,1375 v1(5165,1348)
  Bottom w6: v1@5048.26,1642.97 D42.2@5048.26,1671.47 ; U13.2@5081.7,1321.4 5081.7,1343.7 5086,1348 v1(5165,1348) 5358.97,1348 5370,1359.03 R63.2@5370,1378.72 ; R63.2@5370.28,1379 T50.1@5408,1379
IMU_MISO_5: D54.2 J15.16 R80.2 T62.1 U16.2 | length 834.2
  Top w6: v1(2642.68,3510) J15.16@2642.68,3548.1
  PWR w6: v1(2524,3802) 2551,3775 2551,3549.33 2590.33,3510 v1(2642.68,3510)
  Bottom w6: T62.1@2285,3774 2320,3774 2320,3795 2327,3802 v1(2524,3802) 2623.19,3802 2626.7,3805.51 U16.2@2626.7,3835 ; D54.2@2643,3482 v1@2643,3509.68
IMU_MISO_6: D66.2 J17.16 R97.2 T74.1 U19.2 | length 834.2
  Top w6: v1(4062.68,3518) J17.16@4062.68,3556.1
  PWR w6: v1(3944,3810) 3971,3783 3971,3557.33 4010.33,3518 v1(4062.68,3518)
  Bottom w6: T74.1@3705,3782 3740,3782 3740,3803 3747,3810 v1(3944,3810) 4043.19,3810 4046.7,3813.51 U19.2@4046.7,3843 ; D66.2@4063,3490 v1@4063,3517.68
IMU_MISO_7: D78.2 J20.16 R114.2 T86.1 U22.2 | length 834.2
  Top w6: v1(5404.68,3515) J20.16@5404.68,3553.1
  PWR w6: v1(5286,3807) 5313,3780 5313,3554.33 5352.33,3515 v1(5404.68,3515)
  Bottom w6: T86.1@5047,3779 5082,3779 5082,3800 5089,3807 v1(5286,3807) 5385.19,3807 5388.7,3810.51 U22.2@5388.7,3840 ; D78.2@5405,3487 v1@5405,3514.68
IMU_MISO_8: D90.2 J23.16 R131.2 T98.1 U25.2 | length 834.2
  Top w6: v1(1288.68,3512) J23.16@1288.68,3550.1
  PWR w6: v1(1170,3804) 1197,3777 1197,3551.33 1236.33,3512 v1(1288.68,3512)
  Bottom w6: T98.1@931,3776 966,3776 966,3797 973,3804 v1(1170,3804) 1269.19,3804 1272.7,3807.51 U25.2@1272.7,3837 ; D90.2@1289,3484 v1@1289,3511.68
IMU_MOSI_1: D4.2 J3.1 R10.2 T8.1 U3.5 | length 924.3
  Top w6: J3.1@1052.42,1567.05 v1(1083,1567)
  PWR w6: v1@1083,1568 1083,1368 v1(1132,1319)
  Bottom w6: v1(1083,1567) 1097,1581 D4.2@1121.47,1581 ; U3.5@1086.1,1209 1099,1209 1132,1242 v1(1132,1319) 1466,1319 1493,1346 R10.2@1493,1378.72 ; T8.1@1454,1379 R10.2@1492.72,1379
IMU_MOSI_2: D18.2 J6.1 R28.2 T25.1 U7.5 | length 924.3
  Top w6: J6.1@2404.42,1567.05 v1(2435,1567)
  PWR w6: v1@2435,1568 2435,1368 v1(2484,1319)
  Bottom w6: v1(2435,1567) 2449,1581 D18.2@2473.47,1581 ; U7.5@2438.1,1209 2451,1209 2484,1242 v1(2484,1319) 2818,1319 2845,1346 R28.2@2845,1378.72 ; T25.1@2806,1379 R28.2@2844.72,1379
IMU_MOSI_3: D30.2 J9.1 R45.2 T37.1 U10.5 | length 924.3
  Top w6: J9.1@3765.42,1567.05 v1(3796,1567)
  PWR w6: v1@3796,1568 3796,1368 v1(3845,1319)
  Bottom w6: v1(3796,1567) 3810,1581 D30.2@3834.47,1581 ; U10.5@3799.1,1209 3812,1209 3845,1242 v1(3845,1319) 4179,1319 4206,1346 R45.2@4206,1378.72 ; T37.1@4167,1379 R45.2@4205.72,1379
IMU_MOSI_4: D41.2 J12.1 R62.2 T49.1 U13.5 | length 924.3
  Top w6: J12.1@5087.42,1567.05 v1(5118,1567)
  PWR w6: v1@5118,1568 5118,1368 v1(5167,1319)
  Bottom w6: v1(5118,1567) 5132,1581 D41.2@5156.47,1581 ; U13.5@5121.1,1209 5134,1209 5167,1242 v1(5167,1319) 5501,1319 5528,1346 R62.2@5528,1378.72 ; T49.1@5489,1379 R62.2@5527.72,1379
IMU_MOSI_5: D53.2 J15.1 R79.2 T61.1 U16.5 | length 934
  Top w6: v1(2568,3587.78) J15.1@2603,3587.78
  PWR w6: v1(2545,3819) 2560,3804 2568,3796 v1(2568,3587.78)
  Bottom w6: R79.2@2162.79,3778 2162.79,3810.79 2171,3819 v1(2545,3819) 2545,3927 2565.4,3947.4 U16.5@2587.3,3947.4 ; R79.2@2163,3777.79 T61.1@2200.79,3777.79 ; D53.2@2532.06,3570 2550.22,3570 v1(2568,3587.78)
IMU_MOSI_6: D65.2 J17.1 R96.2 T73.1 U19.5 | length 934
  Top w6: v1(3988,3595.78) J17.1@4023,3595.78
  PWR w6: v1(3965,3827) 3980,3812 3988,3804 v1(3988,3595.78)
  Bottom w6: R96.2@3582.79,3786 3582.79,3818.79 3591,3827 v1(3965,3827) 3965,3935 3985.4,3955.4 U19.5@4007.3,3955.4 ; R96.2@3583,3785.79 T73.1@3620.79,3785.79 ; D65.2@3952.06,3578 3970.22,3578 v1(3988,3595.78)
IMU_MOSI_7: D77.2 J20.1 R113.2 T85.1 U22.5 | length 934
  Top w6: v1(5330,3592.78) J20.1@5365,3592.78
  PWR w6: v1(5307,3824) 5322,3809 5330,3801 v1(5330,3592.78)
  Bottom w6: R113.2@4924.79,3783 4924.79,3815.79 4933,3824 v1(5307,3824) 5307,3932 5327.4,3952.4 U22.5@5349.3,3952.4 ; R113.2@4925,3782.79 T85.1@4962.79,3782.79 ; D77.2@5294.06,3575 5312.22,3575 v1(5330,3592.78)
IMU_MOSI_8: D89.2 J23.1 R130.2 T97.1 U25.5 | length 934
  Top w6: v1(1214,3589.78) J23.1@1249,3589.78
  PWR w6: v1(1191,3821) 1206,3806 1214,3798 v1(1214,3589.78)
  Bottom w6: R130.2@808.79,3780 808.79,3812.79 817,3821 v1(1191,3821) 1191,3929 1211.4,3949.4 U25.5@1233.3,3949.4 ; R130.2@809,3779.79 T97.1@846.79,3779.79 ; D89.2@1178.06,3572 1196.22,3572 v1(1214,3589.78)
IMU_SCLK_1: D3.2 J3.2 R9.2 T6.1 U3.6 | length 745.2
  Top w6: J3.2@1053.42,1539 1053.66,1539.24 v1@1141.76,1539.24
  PWR w6: v1@1085,1185.35 1278.29,1378.65 v1(1278.29,1379) 1195.55,1379 1151,1423.55 1151,1530 v1(1142,1539)
  Bottom w6: U3.6@1066.4,1209 1066.4,1191.3 1072.7,1185 v1(1085,1185) ; D3.2@1121.97,1538.5 v1@1141.5,1538.5 ; T6.1@1259,1413 1278.29,1393.71 v1(1278.29,1379) R9.2@1296,1379
IMU_SCLK_2: D17.2 J6.2 R27.2 T23.1 U7.6 | length 745.2
  Top w6: J6.2@2405.42,1539 2405.66,1539.24 v1@2493.76,1539.24
  PWR w6: v1@2437,1185.35 2630.29,1378.65 v1(2630.29,1379) 2547.55,1379 2503,1423.55 2503,1530 v1(2494,1539)
  Bottom w6: U7.6@2418.4,1209 2418.4,1191.3 2424.7,1185 v1(2437,1185) ; D17.2@2473.97,1538.5 v1@2493.5,1538.5 ; T23.1@2611,1413 2630.29,1393.71 v1(2630.29,1379) R27.2@2648,1379
IMU_SCLK_3: D29.2 J9.2 R44.2 T35.1 U10.6 | length 745.2
  Top w6: J9.2@3766.42,1539 3766.66,1539.24 v1@3854.76,1539.24
  PWR w6: v1@3798,1185.35 3991.29,1378.65 v1(3991.29,1379) 3908.55,1379 3864,1423.55 3864,1530 v1(3855,1539)
  Bottom w6: U10.6@3779.4,1209 3779.4,1191.3 3785.7,1185 v1(3798,1185) ; D29.2@3834.97,1538.5 v1@3854.5,1538.5 ; T35.1@3972,1413 3991.29,1393.71 v1(3991.29,1379) R44.2@4009,1379
IMU_SCLK_4: D40.2 J12.2 R61.2 T47.1 U13.6 | length 745.2
  Top w6: J12.2@5088.42,1539 5088.66,1539.24 v1@5176.76,1539.24
  PWR w6: v1@5120,1185.35 5313.29,1378.65 v1(5313.29,1379) 5230.55,1379 5186,1423.55 5186,1530 v1(5177,1539)
  Bottom w6: U13.6@5101.4,1209 5101.4,1191.3 5107.7,1185 v1(5120,1185) ; D40.2@5156.97,1538.5 v1@5176.5,1538.5 ; T47.1@5294,1413 5313.29,1393.71 v1(5313.29,1379) R61.2@5331,1379
IMU_SCLK_5: D52.2 J15.2 R78.2 T59.1 U16.6 | length 793.2
  Top w6: v1(2503.47,3616.17) J15.2@2602.17,3616.17
  PWR w6: v1(2387,3773) 2474.2,3860.2 v1@2503.74,3860.2 ; v1(2503.47,3616.17) 2503.74,3616.43 v1@2503.74,3860.2 ; v1(2504,3860.2) v1@2503.74,3860.2
  Bottom w6: R78.2@2361.25,3773 v1(2387,3773) ; T59.1@2457,3860.2 v1(2504,3860.2) 2504,3906 2566.96,3968.96 2604.49,3968.96 2607,3966.45 U16.6@2607,3947.4 ; v1(2503.47,3616.17) D52.2@2533,3616.17
IMU_SCLK_6: D64.2 J17.2 R95.2 T71.1 U19.6 | length 793.2
  Top w6: v1(3923.47,3624.17) J17.2@4022.17,3624.17
  PWR w6: v1(3807,3781) 3894.2,3868.2 v1@3923.74,3868.2 ; v1(3923.47,3624.17) 3923.74,3624.43 v1@3923.74,3868.2 ; v1(3924,3868.2) v1@3923.74,3868.2
  Bottom w6: R95.2@3781.25,3781 v1(3807,3781) ; T71.1@3877,3868.2 v1(3924,3868.2) 3924,3914 3986.96,3976.96 4024.49,3976.96 4027,3974.45 U19.6@4027,3955.4 ; v1(3923.47,3624.17) D64.2@3953,3624.17
IMU_SCLK_7: D76.2 J20.2 R112.2 T83.1 U22.6 | length 793.2
  Top w6: v1(5265.47,3621.17) J20.2@5364.17,3621.17
  PWR w6: v1(5149,3778) 5236.2,3865.2 v1@5265.74,3865.2 ; v1(5265.47,3621.17) 5265.74,3621.43 v1@5265.74,3865.2 ; v1(5266,3865.2) v1@5265.74,3865.2
  Bottom w6: R112.2@5123.25,3778 v1(5149,3778) ; T83.1@5219,3865.2 v1(5266,3865.2) 5266,3911 5328.96,3973.96 5366.49,3973.96 5369,3971.45 U22.6@5369,3952.4 ; v1(5265.47,3621.17) D76.2@5295,3621.17
IMU_SCLK_8: D88.2 J23.2 R129.2 T95.1 U25.6 | length 793.2
  Top w6: v1(1149.47,3618.17) J23.2@1248.17,3618.17
  PWR w6: v1(1033,3775) 1120.2,3862.2 v1@1149.74,3862.2 ; v1(1149.47,3618.17) 1149.74,3618.43 v1@1149.74,3862.2 ; v1(1150,3862.2) v1@1149.74,3862.2
  Bottom w6: R129.2@1007.25,3775 v1(1033,3775) ; T95.1@1103,3862.2 v1(1150,3862.2) 1150,3908 1212.96,3970.96 1250.49,3970.96 1253,3968.45 U25.6@1253,3949.4 ; v1(1149.47,3618.17) D88.2@1179,3618.17
IMU_VDD_1: C15.1 D11.2 J3.8 L2.2 | length 152.2
  Top w6: v1(931.34,1410) J3.8@931.34,1444.03
  Bottom w10: L2.2@930,1292.08 C15.1@930,1339 931.15,1340.15 D11.2@931.15,1382.35 ; D11.2@931.34,1382.54 v1(931.34,1410)
IMU_VDD_2: C37.1 D25.2 J6.8 L5.2 | length 152.2
  Top w6: v1(2283.34,1410) J6.8@2283.34,1444.03
  Bottom w10: L5.2@2282,1292.08 2282,1339 2283.15,1340.15 D25.2@2283.15,1382.35 ; D25.2@2283.34,1382.54 v1(2283.34,1410)
IMU_VDD_3: C53.1 D37.2 J9.8 L8.2 | length 152.2
  Top w6: v1(3644.34,1410) J9.8@3644.34,1444.03
  Bottom w10: L8.2@3643,1292.08 C53.1@3643,1339 3644.15,1340.15 D37.2@3644.15,1382.35 ; D37.2@3644.34,1382.54 v1(3644.34,1410)
IMU_VDD_4: C69.1 D48.2 J12.8 L11.2 | length 152.2
  Top w6: v1(4966.34,1410) J12.8@4966.34,1444.03
  Bottom w10: L11.2@4965,1292.08 C69.1@4965,1339 4966.15,1340.15 D48.2@4966.15,1382.35 ; D48.2@4966.34,1382.54 v1(4966.34,1410)
IMU_VDD_5: C85.1 D60.2 J15.8 L13.2 | length 175.4
  Top w6: J15.8@2725.05,3709.83 2725.05,3741.81 v1(2741.74,3758.5)
  Bottom w6: v1(2741.74,3758.5) v1@2741.86,3758.62
  Bottom w10: C85.1@2741.74,3830.5 L13.2@2741.74,3878.64 ; v1@2741.86,3758.62 D60.2@2741.86,3785.42 ; D60.2@2741.99,3785.54 C85.1@2741.99,3830.26
IMU_VDD_6: C101.1 D72.2 J17.8 L16.2 | length 175.4
  Top w6: J17.8@4145.05,3717.83 4145.05,3749.81 v1(4161.74,3766.5)
  Bottom w6: v1(4161.74,3766.5) v1@4161.86,3766.62
  Bottom w10: C101.1@4161.74,3838.5 L16.2@4161.74,3886.64 ; v1@4161.86,3766.62 D72.2@4161.86,3793.42 ; D72.2@4161.99,3793.54 C101.1@4161.99,3838.26
IMU_VDD_7: C117.1 D84.2 J20.8 L19.2 | length 175.4
  Top w6: J20.8@5487.05,3714.83 5487.05,3746.81 v1(5503.74,3763.5)
  Bottom w6: v1(5503.74,3763.5) v1@5503.86,3763.62
  Bottom w10: C117.1@5503.74,3835.5 L19.2@5503.74,3883.64 ; v1@5503.86,3763.62 D84.2@5503.86,3790.42 ; D84.2@5503.99,3790.54 C117.1@5503.99,3835.26
IMU_VDD_8: C133.1 D96.2 J23.8 L22.2 | length 175.4
  Top w6: J23.8@1371.05,3711.83 1371.05,3743.81 v1(1387.74,3760.5)
  Bottom w6: v1(1387.74,3760.5) v1@1387.86,3760.62
  Bottom w10: C133.1@1387.74,3832.5 L22.2@1387.74,3880.64 ; v1@1387.86,3760.62 D96.2@1387.86,3787.42 ; D96.2@1387.99,3787.54 C133.1@1387.99,3832.26
IMU_VDDIO_1: C16.1 D12.2 J3.12 L3.2 | length 156.2
  Top w6: v1@855.48,1567.52 J3.12@891,1567.52
  Bottom w10: L3.2@732.96,1566.69 C16.1@779.88,1566.69 ; C16.1@780.2,1566.53 D12.2@822,1566.53 ; D12.2@822.5,1567.03 v1@854.5,1567.03
  other v1: 855,1567.52
IMU_VDDIO_2: C38.1 D26.2 J6.12 L6.2 | length 156.2
  Top w6: v1@2207.48,1567.52 J6.12@2243,1567.52
  Bottom w10: L6.2@2084.96,1566.69 C38.1@2131.88,1566.69 ; C38.1@2132.2,1566.53 D26.2@2174,1566.53 ; D26.2@2174.5,1567.03 v1@2206.5,1567.03
  other v1: 2207,1567.52
IMU_VDDIO_3: C54.1 D98.2 J9.12 L9.2 | length 156.2
  Top w6: v1@3568.48,1567.52 J9.12@3604,1567.52
  Bottom w10: L9.2@3445.96,1566.69 C54.1@3492.88,1566.69 ; C54.1@3493.2,1566.53 D98.2@3535,1566.53 ; D98.2@3535.5,1567.03 v1@3567.5,1567.03
  other v1: 3568,1567.52
IMU_VDDIO_4: C70.1 D49.2 J12.12 L12.2 | length 156.2
  Top w6: v1@4890.48,1567.52 J12.12@4926,1567.52
  Bottom w10: L12.2@4767.96,1566.69 C70.1@4814.88,1566.69 ; C70.1@4815.2,1566.53 D49.2@4857,1566.53 ; D49.2@4857.5,1567.03 v1@4889.5,1567.03
  other v1: 4890,1567.52
IMU_VDDIO_5: C86.1 D61.2 J15.12 L15.2 | length 173.3
  Top w6: J15.12@2764.42,3587.91 v1@2804.64,3587.91
  Bottom w10: v1(2804.77,3588.04) D61.2@2840.24,3588.04 C86.1@2840.24,3540 ; L15.2@2840.47,3490 C86.1@2840.47,3539.61
IMU_VDDIO_6: C102.1 D73.2 J17.12 L18.2 | length 173.3
  Top w6: J17.12@4184.42,3595.91 v1@4224.64,3595.91
  Bottom w10: v1(4224.77,3596.04) D73.2@4260.24,3596.04 C102.1@4260.24,3548 ; L18.2@4260.47,3498 C102.1@4260.47,3547.61
IMU_VDDIO_7: C118.1 D85.2 J20.12 L21.2 | length 173.3
  Top w6: J20.12@5526.42,3592.91 v1@5566.64,3592.91
  Bottom w10: v1(5566.77,3593.04) D85.2@5602.24,3593.04 C118.1@5602.24,3545 ; L21.2@5602.47,3495 C118.1@5602.47,3544.61
IMU_VDDIO_8: C134.1 D97.2 J23.12 L24.2 | length 173.3
  Top w6: J23.12@1410.42,3589.91 v1@1450.64,3589.91
  Bottom w10: v1(1450.77,3590.04) D97.2@1486.24,3590.04 C134.1@1486.24,3542 ; L24.2@1486.47,3492 C134.1@1486.47,3541.61
INTA1_IMU1: R3.1 U1.32 | length 88.6
  Bottom w6: R3.1@1177.05,1696.65 1194.4,1696.65 1213.43,1677.63 U1.32@1257.79,1677.63
INTA1_IMU2: R21.1 U5.32 | length 88.6
  Bottom w6: R21.1@2529.05,1696.65 2546.4,1696.65 2565.43,1677.63 U5.32@2609.79,1677.63
INTA1_IMU3: R38.1 U8.32 | length 88.6
  Bottom w6: R38.1@3890.05,1696.65 3907.4,1696.65 3926.43,1677.63 U8.32@3970.79,1677.63
INTA1_IMU4: R55.1 U11.32 | length 88.6
  Bottom w6: R55.1@5212.05,1696.65 5229.4,1696.65 5248.43,1677.63 U11.32@5292.79,1677.63
INTA1_IMU5: R72.1 U14.32 | length 92.7
  Bottom w6: U14.32@2398.21,3476.8 2445.02,3476.8 2465.23,3456.6 R72.1@2482.53,3456.6
INTA1_IMU6: R89.1 U17.32 | length 92.7
  Bottom w6: U17.32@3818.21,3484.8 3865.02,3484.8 3885.23,3464.6 R89.1@3902.53,3464.6
INTA1_IMU7: R106.1 U20.32 | length 92.7
  Bottom w6: U20.32@5160.21,3481.8 5207.02,3481.8 5227.23,3461.6 R106.1@5244.53,3461.6
INTA1_IMU8: R123.1 U23.32 | length 92.7
  Bottom w6: U23.32@1044.21,3478.8 1091.02,3478.8 1111.23,3458.6 R123.1@1128.53,3458.6
INTA2_IMU1: R6.1 U1.33 | length 108.4
  Bottom w6: R6.1@1177.58,1735.65 1200.35,1735.65 1206,1730 1206,1709 1217.68,1697.32 U1.33@1257.79,1697.32
INTA2_IMU2: R24.1 U5.33 | length 108.4
  Bottom w6: R24.1@2529.58,1735.65 2552.35,1735.65 2558,1730 2558,1709 2569.68,1697.32 U5.33@2609.79,1697.32
INTA2_IMU3: R41.1 U8.33 | length 108.4
  Bottom w6: R41.1@3890.58,1735.65 3913.35,1735.65 3919,1730 3919,1709 3930.68,1697.32 U8.33@3970.79,1697.32
INTA2_IMU4: R57.1 U11.33 | length 108.4
  Bottom w6: R57.1@5212.58,1735.65 5235.35,1735.65 5241,1730 5241,1709 5252.68,1697.32 U11.33@5292.79,1697.32
INTA2_IMU5: R75.1 U14.33 | length 110
  Bottom w6: U14.33@2398.21,3457.12 2436.88,3457.12 2456,3438 2456,3421.17 2459.51,3417.65 R75.1@2482,3417.65
INTA2_IMU6: R91.1 U17.33 | length 110
  Bottom w6: U17.33@3818.21,3465.12 3856.88,3465.12 3876,3446 3876,3429.17 3879.51,3425.65 R91.1@3902,3425.65
INTA2_IMU7: R109.1 U20.33 | length 110
  Bottom w6: U20.33@5160.21,3462.12 5198.88,3462.12 5218,3443 5218,3426.17 5221.51,3422.65 R109.1@5244,3422.65
INTA2_IMU8: R126.1 U23.33 | length 110
  Bottom w6: U23.33@1044.21,3459.12 1082.88,3459.12 1102,3440 1102,3423.17 1105.51,3419.65 R126.1@1128,3419.65
NetC9_1: C9.1 U2.3 | length 87
  Bottom w6: U2.3@1752.8,1242.4 1796.4,1242.4 1808,1254 C9.1@1835,1254
NetC9_2: C9.2 U2.1 | length 83.8
  Bottom w6: U2.1@1752.8,1293.6 1801.4,1293.6 1807,1288 C9.2@1834.28,1288
NetC10_1: C10.1 U2.4 | length 81.1
  Bottom w6: U2.4@1752.8,1216.8 1830.92,1216.8 C10.1@1833,1214.72
NetC10_2: C10.2 U2.5 | length 84.3
  Bottom w6: U2.5@1752.8,1191.2 1797.8,1191.2 1807.72,1181.28 C10.2@1833,1181.28
NetC12_1: C12.1 U2.6 | length 99.6
  Bottom w6: U2.6@1752.8,1165 1799,1165 1805,1159 1805,1142.8 1808.51,1139.29 C12.1@1832.28,1139.29
NetC13_1: C13.1 U2.2 | length 228.2
  Bottom w6: U2.2@1752.8,1268 1705.51,1268 1702,1271.51 1702,1312 1721,1331 C13.1@1829.57,1331
NetC14_2: C14.2 L1.1 R17.1 U3.8 | length 131.4
  Bottom w10: L1.1@1026.71,1077.21 C14.2@1026.71,1125 ; C14.2@1026.86,1125.15 R17.1@1026.86,1166 ; R17.1@1027.03,1166.17 U3.8@1027,1209
NetC22_2: C22.2 U4.5 | length 75
  Top w6: U4.5@252.76,1597.16 252.76,1668.45 C22.2@255.41,1671.11
NetC31_1: C31.1 U6.3 | length 87
  Bottom w6: U6.3@3104.8,1242.4 3148.4,1242.4 3160,1254 C31.1@3187,1254
NetC31_2: C31.2 U6.1 | length 83.8
  Bottom w6: U6.1@3104.8,1293.6 3153.4,1293.6 3159,1288 C31.2@3186.28,1288
NetC32_1: C32.1 U6.4 | length 81.1
  Bottom w6: U6.4@3104.8,1216.8 3182.92,1216.8 C32.1@3185,1214.72
NetC32_2: C32.2 U6.5 | length 84.3
  Bottom w6: U6.5@3104.8,1191.2 3149.8,1191.2 3159.72,1181.28 C32.2@3185,1181.28
NetC34_1: C34.1 U6.6 | length 99.6
  Bottom w6: U6.6@3104.8,1165 3151,1165 3157,1159 3157,1142.8 3160.51,1139.29 C34.1@3184.28,1139.29
NetC35_1: C35.1 U6.2 | length 228.2
  Bottom w6: U6.2@3104.8,1268 3057.51,1268 3054,1271.51 3054,1312 3073,1331 C35.1@3181.57,1331
NetC36_2: C36.2 L4.1 R35.1 U7.8 | length 131.4
  Bottom w10: L4.1@2378.71,1077.21 C36.2@2378.71,1125 ; C36.2@2378.86,1125.15 R35.1@2378.86,1166 ; R35.1@2379.03,1166.17 U7.8@2379,1209
NetC47_1: C47.1 U9.3 | length 87
  Bottom w6: U9.3@4465.8,1242.4 4509.4,1242.4 4521,1254 C47.1@4548,1254
NetC47_2: C47.2 U9.1 | length 83.8
  Bottom w6: U9.1@4465.8,1293.6 4514.4,1293.6 4520,1288 C47.2@4547.28,1288
NetC48_1: C48.1 U9.4 | length 81.1
  Bottom w6: U9.4@4465.8,1216.8 4543.92,1216.8 C48.1@4546,1214.72
NetC48_2: C48.2 U9.5 | length 84.3
  Bottom w6: U9.5@4465.8,1191.2 4510.8,1191.2 4520.72,1181.28 C48.2@4546,1181.28
NetC50_1: C50.1 U9.6 | length 99.6
  Bottom w6: U9.6@4465.8,1165 4512,1165 4518,1159 4518,1142.8 4521.51,1139.29 C50.1@4545.28,1139.29
NetC51_1: C51.1 U9.2 | length 228.2
  Bottom w6: U9.2@4465.8,1268 4418.51,1268 4415,1271.51 4415,1312 4434,1331 C51.1@4542.57,1331
NetC52_2: C52.2 L7.1 R52.1 U10.8 | length 131.4
  Bottom w10: L7.1@3739.71,1077.21 C52.2@3739.71,1125 ; C52.2@3739.86,1125.15 R52.1@3739.86,1166 ; R52.1@3740.03,1166.17 U10.8@3740,1209
NetC63_1: C63.1 U12.3 | length 87
  Bottom w6: U12.3@5787.8,1242.4 5831.4,1242.4 5843,1254 C63.1@5870,1254
NetC63_2: C63.2 U12.1 | length 83.8
  Bottom w6: U12.1@5787.8,1293.6 5836.4,1293.6 5842,1288 C63.2@5869.28,1288
NetC64_1: C64.1 U12.4 | length 81.1
  Bottom w6: U12.4@5787.8,1216.8 5865.92,1216.8 C64.1@5868,1214.72
NetC64_2: C64.2 U12.5 | length 84.3
  Bottom w6: U12.5@5787.8,1191.2 5832.8,1191.2 5842.72,1181.28 C64.2@5868,1181.28
NetC66_1: C66.1 U12.6 | length 99.6
  Bottom w6: U12.6@5787.8,1165 5834,1165 5840,1159 5840,1142.8 5843.51,1139.29 C66.1@5867.28,1139.29
NetC67_1: C67.1 U12.2 | length 228.2
  Bottom w6: U12.2@5787.8,1268 5740.51,1268 5737,1271.51 5737,1312 5756,1331 C67.1@5864.57,1331
NetC68_2: C68.2 L10.1 R69.1 U13.8 | length 131.4
  Bottom w10: L10.1@5061.71,1077.21 C68.2@5061.71,1125 ; C68.2@5061.86,1125.15 R69.1@5061.86,1166 ; R69.1@5062.03,1166.17 U13.8@5062,1209
NetC79_1: C79.1 U15.3 | length 96.8
  Bottom w6: C79.1@1801.74,3941.38 1841.82,3941.38 1854.6,3928.6 U15.3@1893.2,3928.6
NetC79_2: C79.2 U15.1 | length 114.7
  Bottom w6: C79.2@1801.74,3905.95 1835.49,3905.95 1839,3902.44 1839,3883 1844.6,3877.4 U15.1@1893.2,3877.4
NetC80_1: C80.1 U15.4 | length 102.1
  Bottom w6: C80.1@1801.75,3979.95 1824.05,3979.95 1849.8,3954.2 U15.4@1893.2,3954.2
NetC80_2: C80.2 U15.5 | length 106.2
  Bottom w6: C80.2@1801.74,4014.72 1817.07,4014.72 1852.79,3979 U15.5@1893.2,3979
NetC82_1: C82.1 U15.6 | length 124.2
  Bottom w6: C82.1@1803.72,4058 1825,4058 1834,4049 1834,4027 1855.59,4005.41 U15.6@1893.2,4005.4
NetC83_1: C83.1 U15.2 | length 227.3
  Bottom w6: C83.1@1803.72,3861.65 1939.98,3861.65 1943.51,3865.18 1943.51,3899.49 1940,3903 U15.2@1893.2,3903
NetC84_2: C84.2 L14.1 R86.1 U16.8 | length 129.8
  Bottom w10: R86.1@2646.14,3990 C84.2@2646.14,4029.86 ; C84.2@2646.28,4030 L14.1@2646.28,4077.64 ; U16.8@2646.4,3947.4 R86.1@2646.4,3989.74
NetC95_1: C95.1 U18.3 | length 96.8
  Bottom w6: C95.1@3221.74,3949.38 3261.82,3949.38 3274.6,3936.6 U18.3@3313.2,3936.6
NetC95_2: C95.2 U18.1 | length 114.7
  Bottom w6: C95.2@3221.74,3913.95 3255.49,3913.95 3259,3910.44 3259,3891 3264.6,3885.4 U18.1@3313.2,3885.4
NetC96_1: C96.1 U18.4 | length 102.1
  Bottom w6: C96.1@3221.75,3987.95 3244.05,3987.95 3269.8,3962.2 U18.4@3313.2,3962.2
NetC96_2: C96.2 U18.5 | length 106.2
  Bottom w6: C96.2@3221.74,4022.72 3237.07,4022.72 3272.79,3987 U18.5@3313.2,3987
NetC98_1: C98.1 U18.6 | length 124.2
  Bottom w6: C98.1@3223.72,4066 3245,4066 3254,4057 3254,4035 3275.59,4013.41 U18.6@3313.2,4013.4
NetC99_1: C99.1 U18.2 | length 227.3
  Bottom w6: C99.1@3223.72,3869.65 3359.98,3869.65 3363.51,3873.18 3363.51,3907.49 3360,3911 U18.2@3313.2,3911
NetC100_2: C100.2 L17.1 R103.1 U19.8 | length 129.8
  Bottom w10: R103.1@4066.14,3998 C100.2@4066.14,4037.86 ; C100.2@4066.28,4038 L17.1@4066.28,4085.64 ; U19.8@4066.4,3955.4 R103.1@4066.4,3997.74
NetC111_1: C111.1 U21.3 | length 96.8
  Bottom w6: C111.1@4563.74,3946.38 4603.82,3946.38 4616.6,3933.6 U21.3@4655.2,3933.6
NetC111_2: C111.2 U21.1 | length 114.7
  Bottom w6: C111.2@4563.74,3910.95 4597.49,3910.95 4601,3907.44 4601,3888 4606.6,3882.4 U21.1@4655.2,3882.4
NetC112_1: C112.1 U21.4 | length 102.1
  Bottom w6: C112.1@4563.75,3984.95 4586.05,3984.95 4611.8,3959.2 U21.4@4655.2,3959.2
NetC112_2: C112.2 U21.5 | length 106.2
  Bottom w6: C112.2@4563.74,4019.72 4579.07,4019.72 4614.79,3984 U21.5@4655.2,3984
NetC114_1: C114.1 U21.6 | length 124.2
  Bottom w6: C114.1@4565.72,4063 4587,4063 4596,4054 4596,4032 4617.59,4010.41 U21.6@4655.2,4010.4
NetC115_1: C115.1 U21.2 | length 227.3
  Bottom w6: C115.1@4565.72,3866.65 4701.98,3866.65 4705.51,3870.18 4705.51,3904.49 4702,3908 U21.2@4655.2,3908
NetC116_2: C116.2 L20.1 R120.1 U22.8 | length 129.8
  Bottom w10: R120.1@5408.14,3995 C116.2@5408.14,4034.86 ; C116.2@5408.28,4035 L20.1@5408.28,4082.64 ; U22.8@5408.4,3952.4 R120.1@5408.4,3994.74
NetC127_1: C127.1 U24.3 | length 96.8
  Bottom w6: C127.1@447.74,3943.38 487.82,3943.38 500.6,3930.6 U24.3@539.2,3930.6
NetC127_2: C127.2 U24.1 | length 114.7
  Bottom w6: C127.2@447.74,3907.95 481.49,3907.95 485,3904.44 485,3885 490.6,3879.4 U24.1@539.2,3879.4
NetC128_1: C128.1 U24.4 | length 102.1
  Bottom w6: C128.1@447.75,3981.95 470.05,3981.95 495.8,3956.2 U24.4@539.2,3956.2
NetC128_2: C128.2 U24.5 | length 106.2
  Bottom w6: C128.2@447.74,4016.72 463.07,4016.72 498.79,3981 U24.5@539.2,3981
NetC130_1: C130.1 U24.6 | length 124.2
  Bottom w6: C130.1@449.72,4060 471,4060 480,4051 480,4029 501.59,4007.41 U24.6@539.2,4007.4
NetC131_1: C131.1 U24.2 | length 227.3
  Bottom w6: C131.1@449.72,3863.65 585.98,3863.65 589.51,3867.18 589.51,3901.49 586,3905 U24.2@539.2,3905
NetC132_2: C132.2 L23.1 R137.1 U25.8 | length 129.8
  Bottom w10: R137.1@1292.14,3992 C132.2@1292.14,4031.86 ; C132.2@1292.28,4032 L23.1@1292.28,4079.64 ; U25.8@1292.4,3949.4 R137.1@1292.4,3991.74